# Altium PCB PCB-Thermostat.PcbDoc (part 5 of 5)
Units mm, origin at the board's own origin, x right, y up, seen from the top; angles counter-clockwise.
Board outline 100 x 90 mm, 4 copper layers (Top, PWR, GND, Bottom), stack 1.585 mm thick; 188 components, 167 nets, 703 pads, 398 vias.
Unrouted connection lines stored in the file: 2.
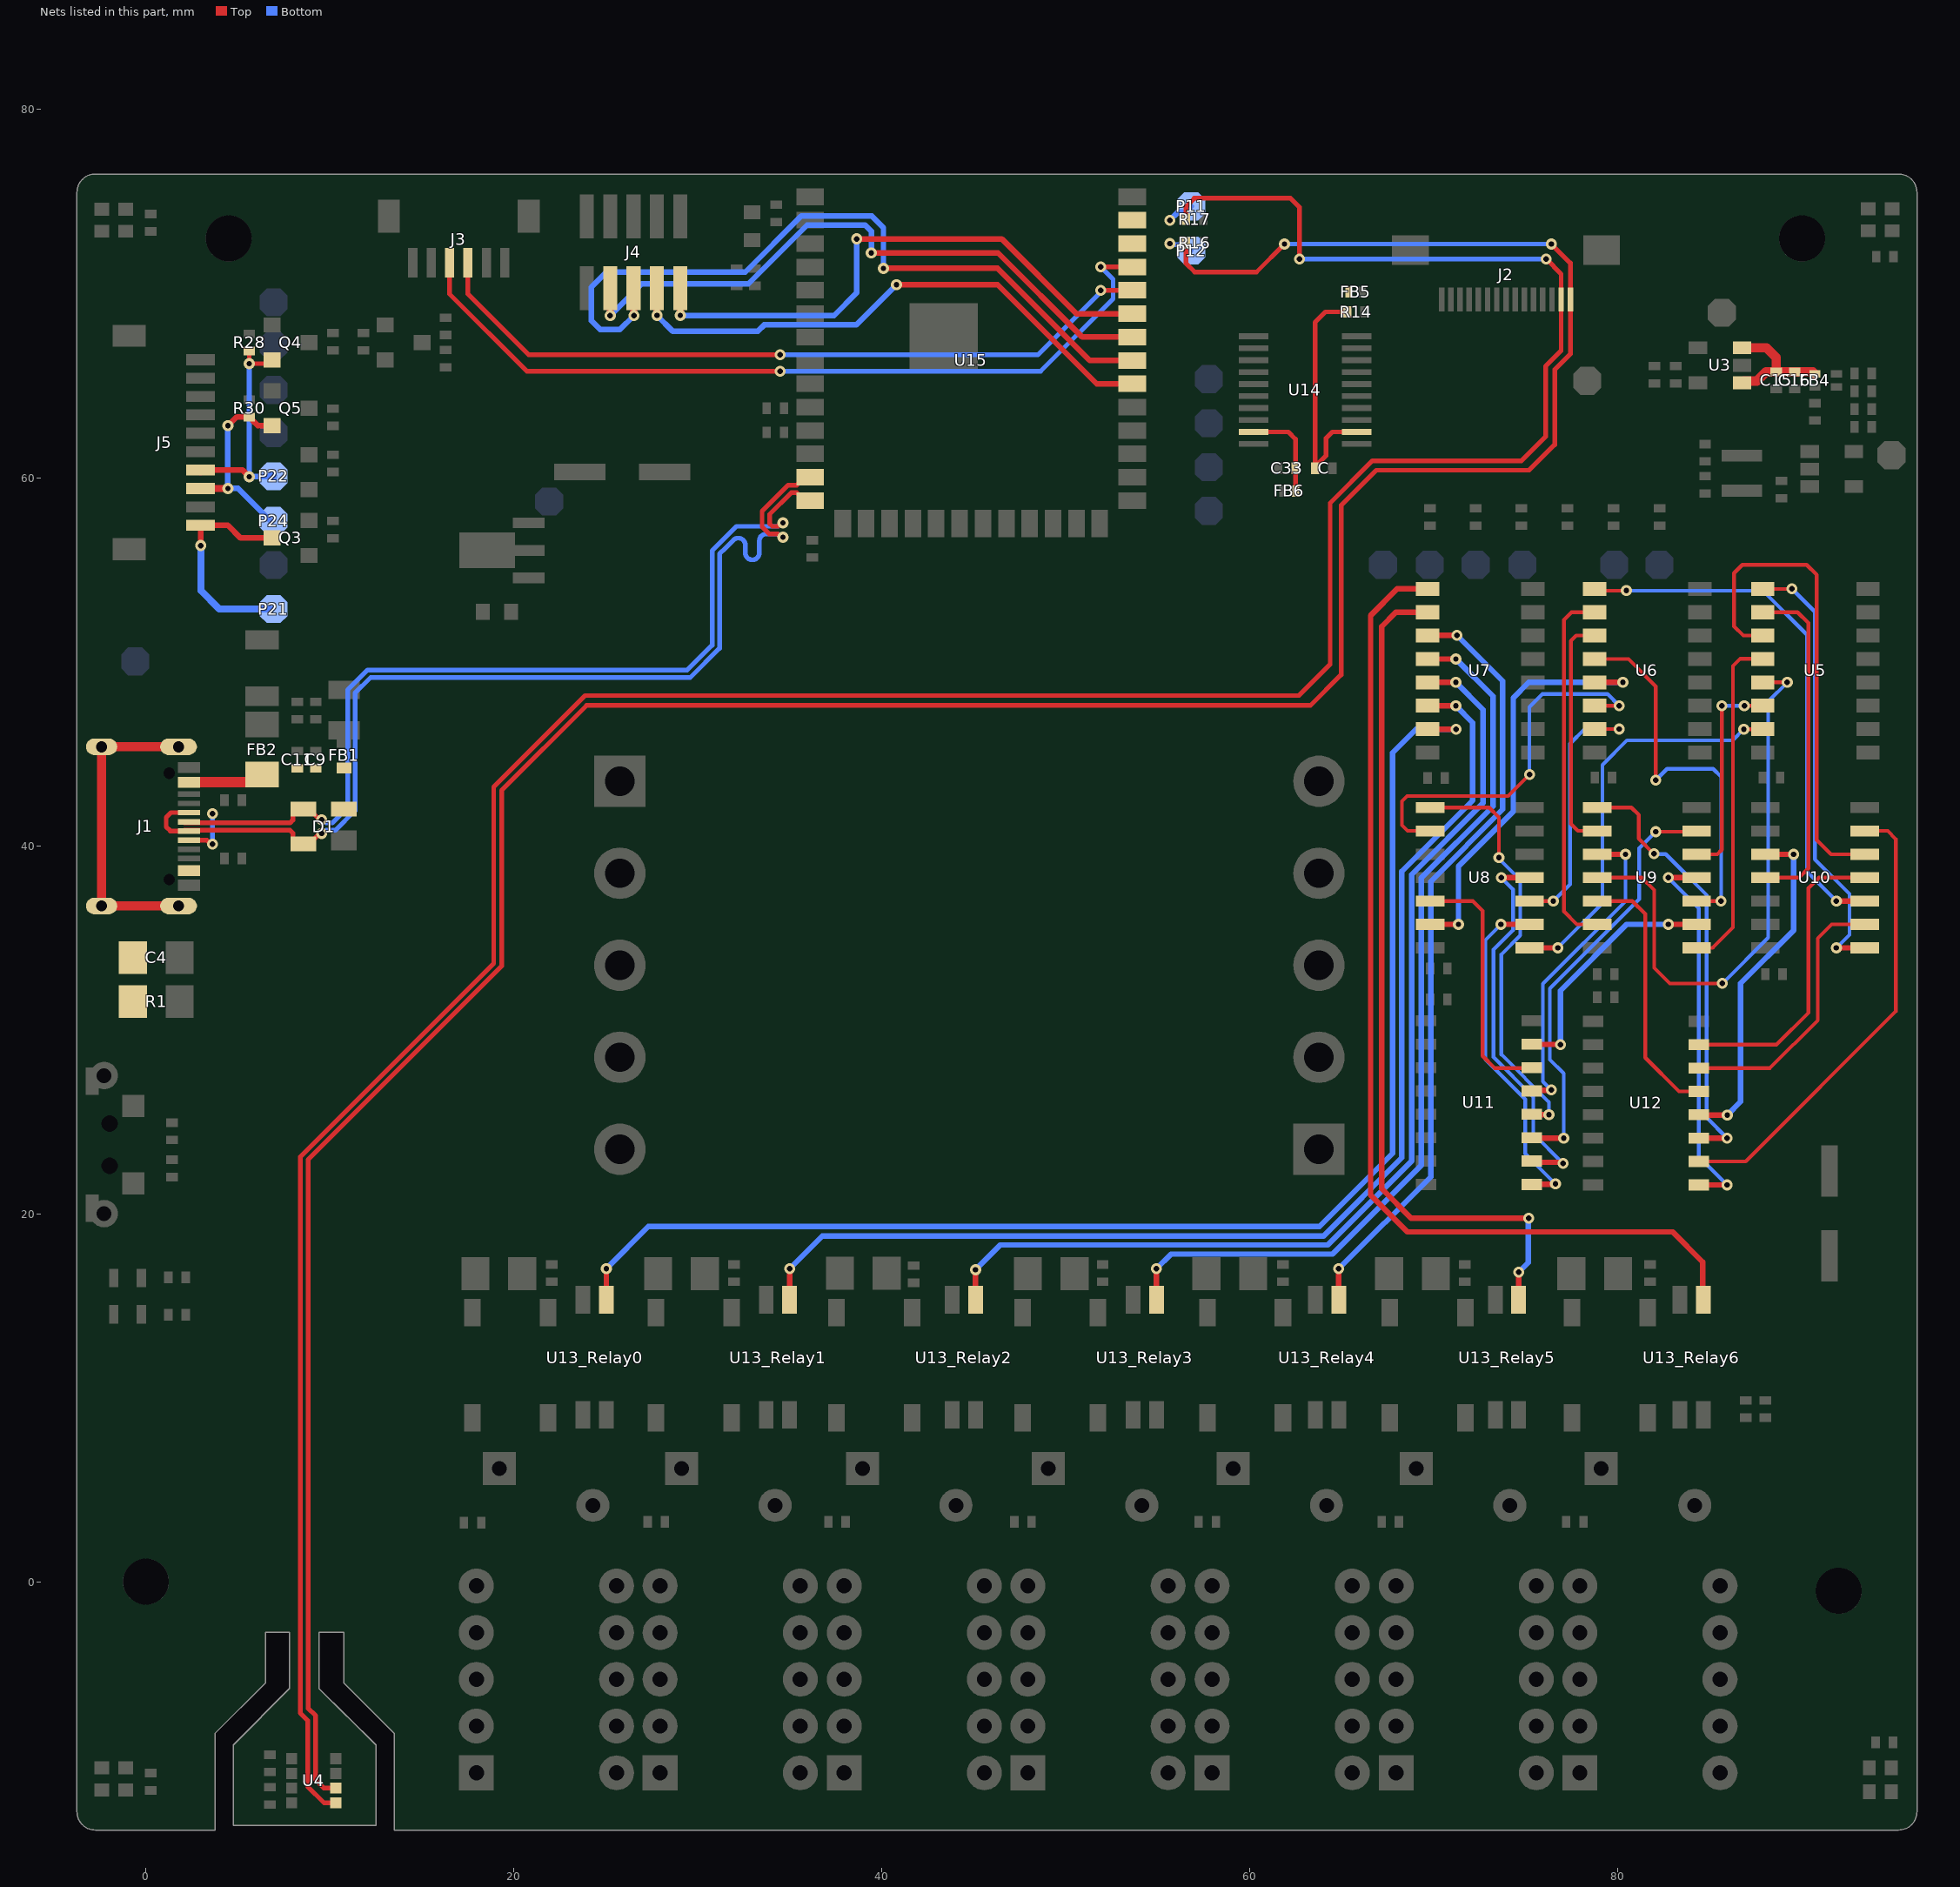
[diagram p5: the nets of this part, all layers, seen from the top]

## Via types
v1: diameter 0.6, hole 0.3, Top to Bottom, 374 vias
v2: diameter 0.8, hole 0.4, Top to Bottom, 22 vias
v3: diameter 0.6, hole 0.3, Top to Bottom, tented top, 2 vias

## Nets (pads, with @x,y where several pads share a name; then routed paths per layer and width w, separated by ;. In a path a pad name is that pad's centre, name@x,y a point inside that pad or via, vN(x,y) a via of type N, cw(c..) or ccw(c..) an arc to the next point about the centre after c; other vN are vias at no path point) (continued)
RELAY_STSN_Relay0: U7.15 U13_Relay0.3 | length 74.3
  Top w0.3: U13_Relay0.3@25.019,15.318 v1(25.019,17.005) ; U7.15@69.654,46.334 U7.15@69.682,46.306 ; U7.15@69.668,46.32 v1(71.203,46.32)
  Bottom w0.3: v1(25.019,17.005) 27.31,19.297 63.772,19.297 67.755,23.28 67.755,45.047 69.028,46.32 v1(71.203,46.32)
RELAY_STSN_Relay1: U7.14 U13_Relay1.3 | length 66.1
  Top w0.3: v1(34.979,17.005) 34.979,15.339 35,15.318 U13_Relay1.3@35,14.772 ; U7.14@69.657,47.602 69.654,47.604 v1(71.189,47.604)
  Bottom w0.3: v1(34.979,17.005) 36.753,18.78 64.001,18.78 68.254,23.033 68.254,38.602 72.108,42.456 72.108,46.686 v1(71.189,47.604)
RELAY_STSN_Relay2: U7.13 U13_Relay2.3 | length 57.6
  Top w0.3: U13_Relay2.3@45.088,15.318 v1(45.088,16.955) ; U7.13@69.695,48.834 69.654,48.874 v1(71.189,48.874)
  Bottom w0.3: v1(45.088,16.955) 46.435,18.302 64.225,18.302 68.783,22.86 68.783,38.425 72.675,42.316 72.675,47.388 v1(71.189,48.874)
RELAY_STSN_Relay3: U7.12 U13_Relay3.3 | length 50.5
  Top w0.3: v1(54.918,17.005) 54.918,15.339 54.939,15.318 U13_Relay3.3@54.939,14.772 ; U7.12@69.654,50.144 v1(71.189,50.144)
  Bottom w0.3: v1(54.918,17.005) 55.718,17.805 64.497,17.805 69.317,22.625 69.317,38.252 73.209,42.144 73.209,48.124 v1(71.189,50.144)
RELAY_STSN_Relay4: U7.11 U13_Relay4.3 | length 42.5
  Top w0.3: U13_Relay4.3@64.824,15.318 v1(64.824,17.005) ; U7.11@69.654,51.414 U7.11@69.719,51.479 ; U7.11@69.719,51.428 v1(71.254,51.428)
  Bottom w0.3: v1(64.824,17.005) 69.825,22.006 69.825,38.053 73.738,41.967 73.738,48.944 v1(71.254,51.428)
RELAY_STSN_Relay5: U7.10 U13_Relay5.3 | length 46.7
  Top w0.3: U7.10@69.654,52.684 67.929,52.684 67.158,51.912 67.158,21.356 68.754,19.759 v1@75.133,19.759 ; U13_Relay5.3@74.603,15.318 v1(74.603,16.818)
  Bottom w0.3: v1(74.603,16.818) 75.133,17.348 v1@75.133,19.757
  other v1: 75.149,19.759
RELAY_STSN_Relay6: U7.9 U13_Relay6.3 | length 56.8
  Top w0.3: U7.9@69.654,53.954 67.999,53.954 66.554,52.509 66.554,21.009 68.554,19.009 82.972,19.009 84.607,17.374 U13_Relay6.3@84.607,15.318
RLY_R0: U8.2 U11.1 | length 18.9
  Top w0.3: v1(73.641,35.719) U8.2@75.194,35.719 ; U11.1@75.319,21.564 75.358,21.602 76.593,21.602 v1(76.606,21.615)
  Bottom w0.2: v1(73.641,35.719) 72.794,34.872 72.794,28.384 74.96,26.219 74.96,23.262 v1(76.606,21.615)
RLY_R1: U9.6 U11.3 | length 22.8
  Top w0.2: v1(82.054,40.759) 83.689,40.759 U9.6@83.729,40.799
  Top w0.3: U11.3@75.319,24.104 v1(77.049,24.104)
  Bottom w0.2: v1(77.049,24.104) 77.049,27.624 76.302,28.372 76.302,32.237 81.155,37.091 81.155,39.86 v1(82.054,40.759)
RLY_R2: U9.10 U11.5 | length 18.7
  Top w0.2: U9.10@78.779,39.529 79.984,39.529
  Top w0.3: U11.5@75.32,26.644 75.371,26.695 76.352,26.695 v1(76.378,26.721) ; U9.10@78.871,39.529 v1(80.406,39.529)
  Bottom w0.2: v1(76.378,26.721) 75.924,27.175 75.924,32.494 80.406,36.977 v1(80.406,39.529)
RLY_R3: U9.2 U11.7 | length 14.3
  Top w0.2: v1@82.814,35.719 U9.2@83.729,35.719
  Top w0.3: U11.7@75.32,29.184 75.332,29.197 76.867,29.197 v1(76.879,29.184) ; v1(82.736,35.719) 82.814,35.719 U9.2@84.271,35.719
  Bottom w0.3: v1(76.879,29.184) 76.879,32.125 80.474,35.719 v1(82.736,35.719)
RLY_R4: U10.6 U12.2 | length 26
  Top w0.2: U12.2@84.396,22.834 86.943,22.834 95.098,30.988 95.098,40.361 94.659,40.799 U10.6@92.729,40.799
RLY_R5: U10.10 U12.4 | length 19
  Top w0.2: U10.10@87.779,39.529 U10.10@88.006,39.529 U10.10@88.624,39.529
  Top w0.3: U12.4@84.396,25.374 84.409,25.362 v1(85.944,25.362) ; U10.10@88.624,39.529 v1(89.541,39.529)
  Bottom w0.3: v1(85.944,25.362) 86.667,26.085 86.667,32.516 89.541,35.391 v1(89.541,39.529)
RLY_R6: U10.2 U12.6 | length 14.2
  Top w0.2: U12.6@84.396,27.914 88.264,27.914 90.854,30.504 90.854,34.959 91.614,35.719 U10.2@92.729,35.719
RLY_S0: U8.4 U11.2 | length 21.1
  Top w0.3: v1(73.659,38.259) U8.4@75.194,38.259 ; U11.2@75.319,22.834 75.363,22.79 76.955,22.79 v1(77.013,22.733)
  Bottom w0.2: v1(73.659,38.259) 74.294,37.624 74.294,35.402 73.237,34.345 73.237,28.507 75.402,26.342 75.402,24.344 v1(77.013,22.733)
RLY_S1: U8.8 U11.4 | length 23
  Top w0.2: U8.8@69.794,42.069 73,42.069 73.533,41.535 v1(73.533,39.345)
  Top w0.3: U11.4@75.32,25.375 75.333,25.387 76.238,25.387 v1(76.251,25.375)
  Bottom w0.2: v1(73.533,39.345) 73.533,39.294 74.693,38.134 74.693,35.119 73.665,34.091 73.665,28.646 76.251,26.06 v1(76.251,25.375)
RLY_S2: U8.12 U11.6 | length 13.4
  Top w0.2: U8.12@69.779,36.989 72.112,36.989 72.645,36.456 72.645,28.568 73.299,27.914 U11.6@74.779,27.914
RLY_S3: U9.4 U12.1 | length 22.6
  Top w0.3: v1(82.736,38.259) U9.4@84.271,38.259 ; U12.1@84.396,21.564 v1(85.931,21.564) U12.1@84.396,21.564
  Bottom w0.2: v1(82.736,38.259) 84.395,36.6 84.395,23.1 v1(85.931,21.564)
RLY_S4: U9.8 U12.3 | length 23.9
  Top w0.2: U9.8@78.871,42.069 80.731,42.069 81.128,41.672 81.128,40.386 v1(81.954,39.559)
  Top w0.3: U12.3@84.396,24.104 v1(85.931,24.104)
  Bottom w0.2: v1(81.954,39.559) 81.975,39.538 82.595,39.538 84.823,37.309 84.823,25.212 v1(85.931,24.104)
RLY_S5: U9.12 U12.5 | length 14.4
  Top w0.2: U9.12@78.871,36.989 80.779,36.989 81.483,36.285 81.483,28.473 83.313,26.644 U12.5@84.396,26.644
RLY_S6: U10.4 U12.7 | length 16.1
  Top w0.2: U12.7@84.396,29.184 88.619,29.184 90.354,30.919 90.354,37.693 90.92,38.259 U10.4@92.729,38.259
RLYRSTN0: U5.15 U8.1 | length 21.8
  Top w0.2: v1@86.741,46.33 v1(86.843,46.33) U5.15@87.609,46.33
  Top w0.3: U8.1@75.194,34.449 v1(76.729,34.449)
  Bottom w0.2: v1(76.729,34.449) 79.151,36.871 79.151,44.385 80.487,45.721 86.234,45.721 v1(86.843,46.33)
RLYRSTN1: U5.14 U9.5 | length 12
  Top w0.2: U9.5@83.729,39.529 U9.5@84.271,39.529 84.724,39.529 85.401,39.529 85.649,39.776 v1(85.649,47.6) ; v1@86.766,47.6 v1(86.868,47.6) U5.14@87.669,47.6
  Bottom w0.2: v1(85.649,47.6) v1(86.868,47.6)
RLYRSTN2: U5.13 U9.11 | length 30.8
  Top w0.2: U9.11@78.871,38.259 81.297,38.259 81.967,37.589 81.967,33.363 82.819,32.512 v1(85.674,32.512) ; U5.13@87.866,48.874 v1(89.199,48.874)
  Bottom w0.2: v1(85.674,32.512) 88.163,35.001 88.163,47.838 v1(89.199,48.874)
RLYRSTN3: U5.12 U9.1 | length 18.9
  Top w0.2: U9.1@83.729,34.449 85.144,34.449 86.254,35.559 86.254,49.759 86.654,50.159 87.739,50.159 U5.12@87.754,50.144
RLYRSTN4: U5.11 U10.5 | length 26.1
  Top w0.2: U5.11@87.754,51.414 86.813,51.414 86.309,51.918 86.309,54.814 86.754,55.259 90.259,55.259 90.798,54.72 90.798,40.308 91.577,39.529 U10.5@92.729,39.529
RLYRSTN5: U5.10 U10.11 | length 19
  Top w0.2: U5.10@87.754,52.684 89.763,52.684 90.348,52.099 90.348,38.76 89.846,38.259 U10.11@88.006,38.259 U10.11@87.779,38.259
RLYRSTN6: U5.9 U10.1 | length 24.4
  Top w0.2: U5.9@87.754,53.954 U5.9@87.866,53.954 89.449,53.954 v1(89.454,53.959) ; 92.406,34.467 92.424,34.449
  Top w0.3: v1(91.871,34.449) 92.424,34.449 U10.1@93.406,34.449
  Bottom w0.2: v1(89.454,53.959) 90.703,52.71 90.703,39.252 92.583,37.372 92.583,35.161 v1(91.871,34.449)
RLYSETN0: U6.15 U8.3 | length 14.6
  Top w0.2: U8.3@75.194,36.989 v1(76.486,36.989) ; U6.15@78.731,46.334 v1(80.064,46.334)
  Bottom w0.2: v1(76.486,36.989) 77.394,37.897 77.394,45.542 78.185,46.334 v1(80.064,46.334)
RLYSETN1: U6.14 U8.9 | length 21
  Top w0.2: U8.9@69.779,40.799 68.567,40.799 68.254,41.112 68.254,42.412 68.544,42.702 74.034,42.702 v1(75.191,43.859) ; U6.14@78.731,47.604 U6.14@78.754,47.604 ; U6.14@78.799,47.559 U6.14@78.754,47.604 ; v1(80.064,47.604) U6.14@78.754,47.604
  Bottom w0.2: v1(75.191,43.859) 75.191,47.53 75.897,48.236 79.432,48.236 v1(80.064,47.604)
RLYSETN2: U6.13 U8.13 | length 22.9
  Top w0.2: U8.13@69.779,35.719 U8.13@69.794,35.719
  Top w0.3: U8.13@69.794,35.719 v1(71.329,35.719) ; U6.13@78.731,48.874 v1(80.266,48.874)
  Bottom w0.3: v1(71.329,35.719) 71.329,38.882 74.309,41.862 74.309,48.034 75.149,48.874 v1(80.266,48.874)
RLYSETN3: U6.12 U9.3 | length 21.6
  Top w0.2: U6.12@78.754,50.144 80.569,50.144 82.054,48.659 v1(82.054,43.559) ; U9.3@83.729,36.989 U9.3@84.271,36.989 v1(85.604,36.989)
  Bottom w0.2: v1(82.054,43.559) 82.666,44.171 85.173,44.171 85.604,43.739 v1(85.604,36.989)
RLYSETN4: U6.11 U9.9 | length 12.9
  Top w0.2: U6.11@78.731,51.414 77.728,51.414 77.441,51.127 77.441,41.177 77.819,40.799 U9.9@78.779,40.799
RLYSETN5: U6.10 U9.13 | length 19.7
  Top w0.2: U6.10@78.754,52.684 77.479,52.684 77.064,52.268 77.064,36.424 77.768,35.719 U9.13@78.779,35.719
RLYSETN6: U6.9 U10.3 | length 29.2
  Top w0.2: U6.9@78.754,53.954 78.849,53.859 v1(80.454,53.859)
  Top w0.3: v1(91.871,36.989) U10.3@93.406,36.989
  Bottom w0.2: v1(80.454,53.859) 87.873,53.859 90.277,51.455 90.277,38.583 v1(91.871,36.989)
RSTKEY: J5.10 P21.1 Q3.3 | length 11.9
  Top w0.305: J5.10@2.961,57.409 4.45,57.409 5.141,56.718 Q3.3@6.865,56.718 ; v1(2.982,56.308) J5.10@2.982,57.388
  Bottom w0.381: v1(2.982,56.308) 2.982,53.863 3.988,52.857 P21.1@6.782,52.857
RX_1V8: J5.7 P22.1 Q4.2 R28.1 | length 12.2
  Top w0.254: R28.1@5.613,66.876 v1(5.613,66.192) 6.661,66.192 Q4.2@6.865,66.396
  Top w0.305: J5.7@2.965,60.405 5.254,60.405 v1(5.613,60.046)
  Top w0.559: J5.7@2.961,60.409 J5.7@2.965,60.405
  Bottom w0.305: v1(5.613,60.046) v1(5.613,66.192) ; v1@5.621,60.053 P22.1@6.84,60.053
  Bottom w0.559: v1(5.613,60.046) v1@5.621,60.053 ; P22.1@6.84,60.053 P22.1@6.858,60.071
RXD: J3.4 U15.36 | length 40.7
  Top w0.254: J3.4@17.5,71.674 17.5,69.98 20.805,66.675 v1(34.468,66.675) ; v1(51.892,70.18) U15.36@53.6,70.18
  Bottom w0.254: v1(34.468,66.675) 48.463,66.675 51.892,70.104 v1(51.892,70.18)
SCL: J2.2 P11.1 R17.1 U4.4 U15.39 | length 166.2
  Top w0.254: U4.4@10.319,-12.02 9.684,-12.02 8.788,-11.125 8.788,-7.544 8.382,-7.138 8.382,23.079 18.898,33.595 18.898,43.189 23.867,48.158 62.662,48.158 64.357,49.853 64.357,58.617 66.658,60.918 74.754,60.918 76.064,62.228 76.064,66.043 76.914,66.893 J2.2@76.914,69.679 76.914,71.066 v1(76.098,71.882) ; R17.1@56.528,74.041 56.528,74.734 56.978,75.184 62.205,75.184 62.687,74.701 v1(62.687,71.882)
  Bottom w0.254: v1(62.687,71.882) v1(76.098,71.882)
  Bottom w0.305: v1(55.651,73.99) 56.084,74.423 56.489,74.423 P11.1@56.807,74.741
SDA: J2.1 P12.1 R16.1 U4.3 U15.38 | length 164.8
  Top w0.254: U4.3@10.319,-11.22 9.671,-11.22 9.22,-10.77 9.22,-7.29 8.812,-6.881 8.812,22.934 19.329,33.452 19.329,43.002 23.952,47.625 63.297,47.625 64.957,49.285 64.957,58.496 66.862,60.401 75.171,60.401 76.564,61.794 76.564,65.867 77.414,66.717 J2.1@77.414,69.679 77.414,71.659 v1(76.378,72.695) ; R16.1@56.528,72.746 56.528,71.641 56.998,71.171 60.35,71.171 v1(61.874,72.695)
  Bottom w0.254: v1@55.626,72.72 55.689,72.657 56.49,72.657 P12.1@56.807,72.339 ; v1(61.874,72.695) v1(76.378,72.695)
  other v1: 55.651,72.72
SH: C4.1 J1.S1 J1.S2 J1.S3 J1.S4 R1.2 | length 17
  Top w0.5: J1.S1@1.77,36.721 J1.S2@-2.41,36.721 J1.S3@-2.41,45.371 J1.S4@1.77,45.371
TCK: J4.4 U15.32 | length 31.3
  Top w0.305: v1(40.792,70.485) 46.289,70.485 51.674,65.1 U15.32@53.6,65.1
  Top w0.381: v1(27.77,68.82) J4.4@27.77,70.688
  Bottom w0.305: v1(27.77,68.82) 27.77,68.811 28.617,67.965 33.261,67.965 33.598,68.302 38.609,68.302 v1(40.792,70.485)
TDI: J4.8 U15.34 | length 35.5
  Top w0.305: v1@39.425,72.212 46.315,72.212 50.887,67.64 U15.34@53.6,67.64
  Top w0.381: v1(25.23,68.811) J4.8@25.23,70.688
  Bottom w0.305: v1(25.23,68.811) 26.955,70.536 32.739,70.536 35.933,73.729 39.088,73.729 39.421,73.397 v1(39.421,72.212)
TDO: J4.6 U15.33 | length 42.1
  Top w0.305: v1(40.081,71.374) 46.286,71.374 51.29,66.37 U15.33@53.6,66.37
  Top w0.381: J4.6@26.506,70.694 26.509,70.691 26.509,68.82 v1(26.518,68.811)
  Bottom w0.305: v1(26.518,68.811) 25.753,68.047 24.689,68.047 24.206,68.529 24.206,70.352 25.025,71.171 32.568,71.171 35.616,74.219 39.445,74.219 40.081,73.583 v1(40.081,71.374)
TMS: J4.2 U15.35 | length 31.5
  Top w0.305: v1(38.633,72.974) 46.506,72.974 50.57,68.91 U15.35@53.6,68.91
  Top w0.381: v1(29.04,68.82) J4.2@29.04,70.673
  Bottom w0.305: v1(29.04,68.82) 29.049,68.811 37.391,68.811 38.633,70.053 v1(38.633,72.974)
TX_1V8: J5.8 P24.1 Q5.2 R30.1 | length 10.8
  Top w0.305: v1(4.451,62.819) 4.921,63.289 R30.1@5.613,63.289 5.702,63.289 5.778,63.213 5.778,63.124 6.083,62.819 Q5.2@6.865,62.819
  Top w0.381: J5.8@2.961,59.409 2.962,59.41 v1(4.451,59.411) v1(4.451,59.411)
  Bottom w0.305: v1(4.451,62.819) v1(4.451,59.411) 5.004,59.411 P24.1@6.756,57.658
TXD: J3.3 U15.37 | length 44.8
  Top w0.254: J3.3@16.5,71.674 16.5,69.984 20.698,65.786 v1(34.468,65.786) ; v1(51.892,71.45) U15.37@53.6,71.45
  Bottom w0.254: v1(34.468,65.786) 48.626,65.786 52.564,69.723 52.564,70.778 v1(51.892,71.45)
USB_N: D1.4 J1.A7 J1.B7 U15.13 | length 56.9
  Top w0.254: J1.A7@2.106,40.796 1.329,40.796 1.098,41.027 1.098,41.533 1.361,41.796 J1.B7@2.34,41.796 ; J1.A7@2.106,40.833 7.838,40.833 7.987,40.684 7.987,40.359 8.26,40.086 8.86,40.086 9.367,40.594 9.481,40.594 v1(9.547,40.66) ; v1(34.62,56.761) 34.526,56.761 34.34,56.947 33.872,56.947 33.485,57.334 33.485,58.171 34.902,59.588 35.368,59.588 35.724,59.944 U15.13@36.119,59.944
  Bottom w0.254: v1(9.547,40.66) 9.641,40.66 9.814,40.833 10.295,40.833 11.366,41.905 11.366,48.291 12.212,49.136 23.526,49.136 27.813,49.136 29.587,49.136 31.175,50.725 31.175,55.856 31.496,56.176 31.925,56.605 cw(c32.195,56.336) 32.576,56.336 32.576,55.914 ccw(c32.957,55.914) 33.338,55.914 33.338,56.566 cw(c33.719,56.566) 33.719,56.947 34.347,56.947 34.36,56.934
USB_P: D1.3 J1.A6 J1.B6 U15.14 | length 53.8
  Top w0.254: J1.A6@2.106,41.239 7.838,41.239 7.987,41.388 7.987,41.713 8.26,41.986 8.86,41.986 9.367,41.479 9.481,41.479 v1(9.547,41.412) ; J1.B6@2.34,40.296 3.306,40.296 3.516,40.086 v1@3.571,40.086 ; v1(34.62,57.539) 34.526,57.539 34.34,57.353 34.04,57.353 33.891,57.502 33.891,58.003 35.071,59.182 35.368,59.182 35.876,58.674 U15.14@36.119,58.674
  Bottom w0.254: v1(3.61,40.086) v1(3.61,41.743) ; v1(9.547,41.412) 9.641,41.412 9.814,41.239 10.126,41.239 10.96,42.073 10.96,48.459 12.044,49.543 29.418,49.543 30.769,50.893 30.769,56.024 32.098,57.353 34.347,57.353 34.36,57.366
VBUS: C9.1 C11.1 D1.2 FB1.1 FB2.1 J1.A4/B9 J1.B4/A9 | length 4.5
  Top w0.254: J1.B4/A9@2.215,38.771 J1.B4/A9@2.34,38.646 ; J1.A4/B9@2.215,43.321 J1.A4/B9@2.34,43.446
  Top w0.559: J1.A4/B9@2.34,43.446 5.904,43.446 FB2.1@6.322,43.863
VCCA: C.2 FB5.2 R14.2 U14.2 | length 13.6
  Top w0.254: C.2@63.536,60.512 C.2@63.536,60.601 ; R14.2@65.286,69.006 64.103,69.006 63.536,68.439 C.2@63.536,60.601 ; U14.2@65.903,62.484 U14.2@65.803,62.484 64.476,62.484 64.135,62.143 64.135,61.2 C.2@63.536,60.601
VCCB: C33.1 FB6.1 U14.19 | length 5.4
  Top w0.254: U14.19@60.103,62.484 62.082,62.484 62.473,62.093 C33.1@62.473,60.512 62.477,60.508 62.477,59.273 FB6.1@62.481,59.269
VIN_3V3C: C15.1 C16.2 FB4.2 U3.1 U3.3 | length 7.1
  Top w0.508: U3.1@86.744,65.153 86.84,65.249 87.551,65.249 88.049,65.748 C15.1@88.595,65.748 ; U3.3@86.744,67.053 88.064,67.053 88.595,66.523 C15.1@88.595,65.748 ; FB4.2@90.703,65.628 90.703,65.636 90.591,65.748 C16.2@89.606,65.748 C15.1@88.595,65.748
pads on no net: J1.A8 J1.B8 J1.MH J4.7 LED6.2 SW1.3 SW1.4 SW1.5 SW1.6 SW1.MH0 SW1.MH1 U1.4 U3.4 U5.7 U6.7 U7.7 U8.5 U8.6 U8.10 U8.11 U10.8 U10.9 U10.12 U10.13 U15.16 U15.26

## Polygon pours and split planes (outlines as drawn)
GND on Top "GND_L01_P003" (solid, remove dead copper, pour order 3): -3.226,-10.24 ccw(c-0.722,-10.761) -1.902,-13.03 3.124,-13.03 3.124,-7.798 5.893,-5.029 5.893,-2.134 7.8,-2.134 9.4,-2.134 11.455,-2.134 11.455,-5.156 14.11,-7.811 14.11,-13.03 91.575,-13.03 ccw(c92.804,-9.767) 95.829,-11.5 95.839,74.646 ccw(c94.313,74.481) 94.313,76.016 -2.531,76.016 ccw(c-2.427,75.208) -3.226,75.366
VBUS on Top "VBUS_L01_P000" (solid, pour order 0): 2.106,43.739 0.896,43.739 -0.254,42.589 -0.254,39.714 1.006,38.454 2.106,38.454
+3V3 on Top "+3V3_L01_P015" (solid, pour order 15): 19.94,57.252 19.94,62.303 25.222,62.303 25.222,57.252
+5V on Top "+5V_L01_P012" (solid, remove dead copper, pour order 12): 9.906,47.959 9.906,51.715 12.979,54.788 12.979,62.459 18.72,62.459 18.72,57.012 23.787,57.012 23.787,55.079 18.72,55.079 18.72,47.959 18.647,47.959
GND on Bottom "GND_L04_P007" (solid, remove dead copper, pour order 7): -3.22,-10.231 ccw(c-0.715,-10.752) -1.896,-13.021 3.13,-13.021 3.13,-7.789 5.899,-5.02 5.899,-2.125 7.806,-2.125 9.406,-2.125 11.462,-2.125 11.462,-5.147 14.116,-7.802 14.116,-13.021 91.581,-13.021 ccw(c92.81,-9.758) 95.836,-11.491 95.845,74.655 ccw(c94.319,74.49) 94.319,76.025 -2.525,76.025 ccw(c-2.421,75.217) -3.22,75.375
+3V3 on Bottom "+3V3_L04_P010" (solid, pour order 10): 19.939,62.433 25.4,62.433 25.4,57.252 19.939,57.252
+5V on Bottom "+5V_L04_P014" (solid, pour order 14): 18.898,59.487 18.898,51.816 12.751,51.816 12.751,59.487
+5V on Bottom "+5V_L04_P013" (solid, remove dead copper, pour order 13): 13.462,60.884 13.462,51.74 19.05,51.74 19.075,51.74 19.075,62.408 13.462,62.408
+3V3 on PWR "+3V3_L02_P008" (solid, remove dead copper, pour order 8): -3.226,-10.24 ccw(c-0.722,-10.761) -1.902,-13.03 3.124,-13.03 3.124,-7.798 5.893,-5.029 5.893,-2.134 7.8,-2.134 9.4,-2.134 11.455,-2.134 11.455,-5.156 14.11,-7.811 14.11,-13.03 91.575,-13.03 ccw(c92.804,-9.767) 95.829,-11.5 95.839,74.646 ccw(c94.313,74.481) 94.313,76.016 -2.531,76.016 ccw(c-2.427,75.208) -3.226,75.366
+5V on PWR "+5V_L02_P011" (solid, pour order 11): 18.898,59.487 18.898,52.781 12.751,52.781 12.751,59.487
GND on GND "GND_L03_P006" (solid, remove dead copper, pour order 6): -3.226,-10.24 ccw(c-0.722,-10.761) -1.902,-13.03 3.124,-13.03 3.124,-7.798 5.893,-5.029 5.893,-2.134 7.8,-2.134 9.4,-2.134 11.455,-2.134 11.455,-5.156 14.11,-7.811 14.11,-13.03 91.575,-13.03 ccw(c92.804,-9.767) 95.829,-11.5 95.839,74.646 ccw(c94.313,74.481) 94.313,76.016 -2.531,76.016 ccw(c-2.427,75.208) -3.226,75.366

## Keep-outs
Top:
  region: 9.4,-5.814 12.5,-8.89 12.5,-13.25 4.75,-13.25 4.75,-8.875 7.8,-5.807 7.8,-2.75 9.4,-2.75
  region: 69.955,20.549 86.955,20.549 86.955,-13.267 16.129,-13.275 16.129,17.912 20.277,22.186 20.277,43.34 23.571,46.634 69.955,46.634
PWR:
  region: 9.4,-5.814 12.5,-8.89 12.5,-13.25 4.75,-13.25 4.75,-8.875 7.8,-5.807 7.8,-2.75 9.4,-2.75
  region: 69.955,20.549 86.955,20.549 86.955,-13.267 16.129,-13.275 16.129,17.912 20.277,22.186 20.277,43.34 23.571,46.634 69.955,46.634
GND:
  region: 9.4,-5.814 12.5,-8.89 12.5,-13.25 4.75,-13.25 4.75,-8.875 7.8,-5.807 7.8,-2.75 9.4,-2.75
  region: 69.955,20.549 86.955,20.549 86.955,-13.267 16.129,-13.275 16.129,17.912 20.277,22.186 20.277,43.34 23.571,46.634 69.955,46.634
Bottom:
  region: 9.4,-5.814 12.5,-8.89 12.5,-13.25 4.75,-13.25 4.75,-8.875 7.8,-5.807 7.8,-2.75 9.4,-2.75
  region: 69.955,20.549 86.955,20.549 86.955,-13.267 16.129,-13.275 16.129,17.912 20.277,22.186 20.277,43.34 23.571,46.634 69.955,46.634

## Other copper
Top:
  rectangle net 5V_Clean: 84.369,57.277 90.957,59.104
  rectangle net USB_P: 3.327,41.123 3.924,42.023
  rectangle net +3V3: 19.94,57.252 25.222,62.303
  rectangle net +5V: 85.471,60.757 87.935,62.332
  rectangle net NetQ1_3: 14.545,66.936 16.599,67.756
  rectangle net NetQ1_3: 15.964,66.707 16.599,67.984
  rectangle net GND: -1.814,55.509 -0.014,68.309
  rectangle net VBUS: 10.06,41.586 11.709,44.628
  rectangle net NetC8_1: 10.36,45.315 11.709,47.295
  rectangle net SH: -3.2,30.632 0.051,34.798
  rectangle net 5V_Clean: 89.921,57.277 90.957,59.865
  rectangle net 5V_Clean: 84.369,57.277 88.265,59.66
  rectangle net +5V: 83.21,61.366 87.935,62.332
  rectangle net VCCA: 64.999,68.631 65.659,70.46
  rectangle net +5V: 94.463,-10.566 95.352,-7.366
  rectangle net GPIO5: 81.824,56.363 82.688,57.633
  rectangle net GPIO4: 79.324,56.363 80.188,57.633
  rectangle net GPIO9: 74.324,56.134 75.188,57.633
  rectangle net GPIO8: 71.824,56.185 72.688,57.633
  rectangle net SH: -3.2,30.632 -1.473,36.966
  rectangle net GND: 2.134,66.109 3.81,67.886
  rectangle net SCL: 52.85,73.54 56.737,74.44
  rectangle net SDA: 52.85,72.27 56.775,73.17
  rectangle net GPIO7: 69.342,56.134 70.206,57.633
  rectangle net +5V: 94.488,70.434 95.356,73.821
  rectangle net VBUS: 5.283,43.053 11.709,44.628
  rectangle net +5V: -1.575,72.212 0.663,73.787
  rectangle net +5V: -1.499,-11.963 0.663,-10.871
  rectangle net GND: 4.953,42.113 6.375,42.875
  rectangle net NetLED1_1: -0.5,13.919 1.506,15.138
  rectangle net NetLED2_1: -0.5,15.9 1.506,17.12
  rectangle net 3V3_C: 92.116,60.452 95.809,62.027
  rectangle net 1V8_SENSOR: 77.784,64.759 84.912,65.507
  rectangle net 5V_TABLET: 0.711,60.935 3.886,62.789
  rectangle net GND: 7.874,47.574 9.576,48.793
  rectangle net NetC10_1: 5.283,46.583 7.391,48.793
  rectangle net NetC10_1: 5.283,45.745 8.56,47.295
  region net NetC8_1: 11.709,47.295 8.823,47.295 8.823,45.745 11.709,45.745
  rectangle net NetR19_1: 34.361,62.096 36.85,63.01
  rectangle net NetR18_1: 34.386,63.366 36.85,64.28
  region net +3V3: 36.869,74.44 33.924,74.44 33.924,73.553 30.099,73.553 30.099,72.111 33.31,72.111 34.808,73.533 36.869,73.533
  region net GND: 93.04,24.336 93.04,20.297 89.977,20.297 89.977,24.336
  region net +3V3: 93.04,19.736 93.04,15.697 89.977,15.697 89.977,19.736
  region net +5V: 58.754,56.159 60.579,56.159 60.579,54.28 58.754,54.28
  region net GND: 5.918,38.125 5.918,37.363 5.918,34.671 3.226,34.671 3.226,38.125
  region net GND: 4.445,48.006 4.369,47.93 4.369,44.755 3.505,44.755 3.505,46.33 2.642,46.33 2.642,48.006
Bottom:
  rectangle net +3V3: 30.074,71.958 31.582,73.762
  rectangle net 5V_Clean: 85.344,57.048 88.036,58.903
  region net ESP_TXD: 8.407,68.097 8.407,66.37 6.198,66.37 6.172,66.396 6.172,68.097
  region net +5V: 58.754,56.159 60.579,56.159 60.579,54.28 58.754,54.28

## Silkscreen, mask and mechanical layers (free items; w line width, h text height)
Top Overlay:
  lines w0.254: 8.23,43.81 8.23,43.282 8.484,43.028 11.659,43.028 11.887,42.799 ; 9.711,45.263 9.957,45.263 9.957,43.672 10.144,43.485 13.995,43.485 ; 88.214,62.865 88.671,62.408 90.246,62.408 91.338,62.408 92.329,63.398
  text "JLCJLCJLCJLC" at 39.878,75.227 h1.52
  text "%" at 33.796,75.174 h0.64
  text "RADAR" at 68.732,74.755 h1.78
  text "%" at -0.226,74.576 h0.64
  text "%" at 93.766,71.528 h0.64 r90
  text "3V3_SENSOR" at 80.004,69.952 h1.52
  text "%" at 94.075,66.167 h0.64 r270
  text "%" at 87.96,66.091 h0.76
  text "%" at 94.075,65.176 h0.64 r270
  text "%" at 91.135,64.389 h0.64 r270
  text "%" at 82.648,63.824 h0.64
  text "1V8_SENSOR" at 72.09,62.645 h1.52
  text "%" at 94.996,62.281 h0.64 r90
  text "%" at 64.846,60.985 h0.64 r270
  text "%" at 61.189,60.026 h0.64 r90
  text "%" at 89.37,58.504 h0.64 r180
  text "3V3_C" at 95.688,55.778 h1.52 r90
  text "TABLET" at -1.88,55.474 h1.78 r90
  text "%" at 7.747,48.128 h0.64
  text "%" at 8.747,48.128 h0.64
  text "%" at 77.529,44.192 h0.64 r270
  text "%" at 86.627,44.19 h0.64 r270
  text "%" at 68.438,44.168 h0.64 r270
  text "%" at 68.58,33.797 h0.64 r270
  text "%" at 77.605,33.49 h0.64 r270
  text "%" at 86.737,33.497 h0.64 r270
  text "%" at 77.596,32.233 h0.64 r270
  text "%" at 68.559,32.124 h0.64 r270
  text "Thermostat-v2.0" at 8.56,30.829 h2.1
  text "%" at 0.943,25.293 h0.64
  text "#" at 17.031,17.818 h1.14
  text "#" at 26.962,17.818 h1.14
  text "#" at 36.881,17.818 h1.14
  text "#" at 47.053,17.818 h1.14
  text "#" at 56.756,17.818 h1.14
  text "#" at 66.688,17.818 h1.14
  text "#" at 76.594,17.818 h1.14
  text "$" at 21.609,17.551 h1.14
  text "$" at 31.515,17.551 h1.14
  text "$" at 51.556,17.551 h1.14
  text "$" at 61.36,17.551 h1.14
  text "$" at 71.241,17.551 h1.14
  text "$" at 81.299,17.551 h1.14
  text "$" at 41.269,17.501 h1.14
  text "*" at 23.571,15.912 h1.14
  text "*" at 33.528,15.912 h1.14
  text "*" at 43.813,15.912 h1.14
  text "*" at 53.467,15.912 h1.14
  text "*" at 63.373,15.912 h1.14
  text "*" at 73.152,15.912 h1.14
  text "*" at 83.185,15.912 h1.14
  text "&" at 75.955,12.446 h1.14
  text "&" at 16.24,12.421 h1.14
  text "&" at 26.222,12.421 h1.14
  text "&" at 36.027,12.421 h1.14
  text "&" at 46.161,12.421 h1.14
  text "&" at 56.143,12.421 h1.14
  text "&" at 66.049,12.395 h1.14
  text "@" at 17.602,3.874 h1.02
  text "@" at 27.534,3.874 h1.02
  text "@" at 47.549,3.874 h1.02
  text "@" at 67.488,3.874 h1.02
  text "@" at 37.465,3.849 h1.02
  text "@" at 57.48,3.849 h1.02
  text "@" at 77.495,3.696 h1.02
  text "%" at 6.248,-9.068 h0.64
  text "%" at 93.689,-9.224 h0.64 r90
  text "%" at -0.213,-10.043 h0.64
  text "%" at 7.214,-12.319 h0.64 r180
Bottom Overlay:
  text "SCL" at 55.884,74.057 h1.52
  text "SDA" at 55.883,71.66 h1.52
  text "1V8" at 5.929,68.859 h1.52
  text "ESP_TXD" at 5.928,66.345 h1.52
  text "CS" at 56.771,64.592 h1.52
  text "ESP_RXD" at 5.979,63.906 h1.52
  text "SCLK" at 56.772,62.272 h1.52
  text "RGB_DATA" at 5.954,61.595 h1.52
  text "MISO" at 56.772,59.885 h1.52
  text "RX_1V8" at 5.954,59.246 h1.52
  text "3V3" at 20.936,58.014 h1.52
  text "MOSI" at 56.796,57.497 h1.52
  text "TX_1V8" at 5.98,56.845 h1.52
  text "RLYADDR0" at 69.068,56.269 h1.52 r270
  text "RLYADDR1" at 71.558,56.282 h1.52 r270
  text "RLYADDR2" at 74.123,56.269 h1.52 r270
  text "RLYSTS" at 66.513,56.233 h1.52 r270
  text "RLYSET" at 79.075,56.235 h1.52 r270
  text "RLYRST" at 81.571,56.235 h1.52 r270
  text "PWRKEY" at 5.978,54.559 h1.52
  text "RSTKEY" at 5.953,52.121 h1.52
  text "5V_TABLET" at 8.52,49.174 h1.52
  text "Note:" at 15.926,12.649 h1.78
  text "$>> R13_Relay0,R13_Relay6" at 16.053,10.819 h1.52
  text "@>> R12_Relay0,R12_Relay6" at 16.053,9.075 h1.52
  text "&>> BR1_Relay0,BR1_Relay6" at 16.053,7.323 h1.52
  text "#>> C31_Relay0,C31_Relay6" at 16.053,5.734 h1.52
  text "*>> U13_Relay0,U13_Relay6" at 16.053,4.135 h1.52
  text "%>> 100nF 0402" at 16.053,2.132 h1.52
Dimension:
  circle w0.013: c0,0 r1.25
  circle w0.013: c17.94,-0.17 r0.4
  circle w0.013: c17.94,-2.71 r0.4
  circle w0.013: c17.94,-5.25 r0.4
  circle w0.013: c17.94,-7.79 r0.4
  circle w0.013: c17.94,-10.33 r0.4
  circle w0.013: c25.56,-0.17 r0.4
  circle w0.013: c25.56,-2.71 r0.4
  circle w0.013: c25.56,-5.25 r0.4
  circle w0.013: c27.94,-0.17 r0.4
  circle w0.013: c27.94,-2.71 r0.4
  circle w0.013: c27.94,-5.25 r0.4
  circle w0.013: c25.56,-7.79 r0.4
  circle w0.013: c25.56,-10.33 r0.4
  circle w0.013: c27.94,-7.79 r0.4
  circle w0.013: c27.94,-10.33 r0.4
  circle w0.013: c35.56,-0.17 r0.4
  circle w0.013: c35.56,-2.71 r0.4
  circle w0.013: c37.94,-0.17 r0.4
  circle w0.013: c37.94,-2.71 r0.4
  circle w0.013: c35.56,-5.25 r0.4
  circle w0.013: c37.94,-5.25 r0.4
  circle w0.013: c35.56,-7.79 r0.4
  circle w0.013: c37.94,-7.79 r0.4
  circle w0.013: c35.56,-10.33 r0.4
  circle w0.013: c37.94,-10.33 r0.4
  circle w0.013: c45.56,-0.17 r0.4
  circle w0.013: c47.94,-0.17 r0.4
  circle w0.013: c45.56,-2.71 r0.4
  circle w0.013: c47.94,-2.71 r0.4
  circle w0.013: c45.56,-5.25 r0.4
  circle w0.013: c47.94,-5.25 r0.4
  circle w0.013: c55.56,-0.17 r0.4
  circle w0.013: c55.56,-2.71 r0.4
  circle w0.013: c55.56,-5.25 r0.4
  circle w0.013: c45.56,-7.79 r0.4
  circle w0.013: c47.94,-7.79 r0.4
  circle w0.013: c45.56,-10.33 r0.4
  circle w0.013: c47.94,-10.33 r0.4
  circle w0.013: c55.56,-7.79 r0.4
  circle w0.013: c55.56,-10.33 r0.4
  circle w0.013: c57.94,-0.17 r0.4
  circle w0.013: c57.94,-2.71 r0.4
  circle w0.013: c57.94,-5.25 r0.4
  circle w0.013: c65.56,-0.17 r0.4
  circle w0.013: c65.56,-2.71 r0.4
  circle w0.013: c67.94,-0.17 r0.4
  circle w0.013: c67.94,-2.71 r0.4
  circle w0.013: c65.56,-5.25 r0.4
  circle w0.013: c67.94,-5.25 r0.4
  circle w0.013: c57.94,-7.79 r0.4
  circle w0.013: c57.94,-10.33 r0.4
  circle w0.013: c65.56,-7.79 r0.4
  circle w0.013: c67.94,-7.79 r0.4
  circle w0.013: c65.56,-10.33 r0.4
  circle w0.013: c67.94,-10.33 r0.4
  circle w0.013: c75.56,-0.17 r0.4
  circle w0.013: c77.94,-0.17 r0.4
  circle w0.013: c75.56,-2.71 r0.4
  circle w0.013: c77.94,-2.71 r0.4
  circle w0.013: c75.56,-5.25 r0.4
  circle w0.013: c77.94,-5.25 r0.4
  circle w0.013: c75.56,-7.79 r0.4
  circle w0.013: c77.94,-7.79 r0.4
  circle w0.013: c75.56,-10.33 r0.4
  circle w0.013: c77.94,-10.33 r0.4
  circle w0.013: c85.56,-0.17 r0.4
  circle w0.013: c85.56,-2.71 r0.4
  circle w0.013: c85.56,-5.25 r0.4
  circle w0.013: c92,-0.5 r1.25
  circle w0.013: c85.56,-7.79 r0.4
  circle w0.013: c85.56,-10.33 r0.4
  lines w0.254: 15.519,-13.564 15.519,38.125 15.519,-13.564
Board Outline:
  lines w0.254: 56.871,76.505 56.883,76.492 ; -3.75,-12.5 ccw(c-2.75,-12.5) -2.75,-13.5 3.75,-13.5 3.75,-8.25 6.5,-5.5 6.5,-2.75 7.8,-2.75 7.8,-5.8 4.75,-8.875 4.75,-13.25 12.5,-13.25 12.5,-8.875 9.4,-5.8 9.4,-2.75 10.75,-2.75 10.75,-5.5 13.5,-8.25 13.5,-13.5 95.25,-13.5 ccw(c95.25,-12.5) 96.25,-12.5 96.25,75.5 ccw(c95.25,75.5) 95.25,76.5 -2.75,76.5 ccw(c-2.75,75.5) -3.75,75.5 -3.75,-12.5
Fabrication:
  drawing of 511 lines, arcs and shapes, not listed
  text "Layer" at 109.487,93.686 h1.52
  text "Name" at 119.898,93.686 h1.52
  text "Material" at 143.514,93.686 h1.52
  text "Thickness" at 165.352,93.686 h1.52
  text "Constant" at 181.858,93.686 h1.52
  text "Board Layer Stack" at 196.332,93.686 h1.52
  text "Top Overlay" at 119.898,90.638 h1.52
  text "Top Solder" at 119.898,87.59 h1.52
  text "Solder Resist" at 143.514,87.59 h1.52
  text "0.39mil" at 165.352,87.59 h1.52
  text "3.3" at 181.858,87.59 h1.52
  text "1" at 109.487,84.542 h1.52
  text "Top" at 119.898,84.542 h1.52
  text "1.38mil" at 165.352,84.542 h1.52
  text "Dielectric 4" at 119.898,81.494 h1.52
  text "PP-006" at 143.514,81.494 h1.52
  text "8.27mil" at 165.352,81.494 h1.52
  text "4.6" at 181.858,81.494 h1.52
  text "2" at 109.487,78.446 h1.52
  text "PWR" at 119.898,78.446 h1.52
  text "CF-004" at 143.514,78.446 h1.52
  text "0.60mil" at 165.352,78.446 h1.52
  text "Dielectric 1" at 119.898,75.398 h1.52
  text "FR-4" at 143.514,75.398 h1.52
  text "41.93mil" at 165.352,75.398 h1.52
  text "4.6" at 181.858,75.398 h1.52
  text "3" at 109.487,72.35 h1.52
  text "GND" at 119.898,72.35 h1.52
  text "CF-004" at 143.514,72.35 h1.52
  text "0.60mil" at 165.352,72.35 h1.52
  text "Dielectric 5" at 119.898,69.302 h1.52
  text "PP-006" at 143.514,69.302 h1.52
  text "8.27mil" at 165.352,69.302 h1.52
  text "4.6" at 181.858,69.302 h1.52
  text "4" at 109.487,66.254 h1.52
  text "Bottom" at 119.898,66.254 h1.52
  text "1.38mil" at 165.352,66.254 h1.52
  text "Bottom Solder" at 119.898,63.206 h1.52
  text "Solder Resist" at 143.514,63.206 h1.52
  text "0.39mil" at 165.352,63.206 h1.52
  text "3.3" at 181.858,63.206 h1.52
  text "Bottom Overlay" at 119.898,60.158 h1.52
  text "4-Layer Stackup 1.6mm FR4" at 26.289,-17.048 h3.81
Mechanical 13:
  drawing of 8987 lines, arcs and shapes, not listed
Drill Drawing:
  circle w0.254: c-1.813,117.431 r0.508
  circle w0.254: c-1.813,117.431 r0.847
  lines w0.254: -2.66,109.811 -1.813,108.965 -0.966,109.811 -1.813,110.658 -2.66,109.811 ; -2.66,112.775 -0.966,112.775 -0.966,114.468 -2.66,114.468 -2.66,112.775 ; -2.66,120.395 -2.66,120.818 -2.236,121.241 -2.66,121.665 -2.66,122.088 -2.236,122.088 -1.813,121.665 -1.39,122.088 -0.966,122.088 -0.966,121.665 -1.39,121.241 -0.966,120.818 -0.966,120.395 -1.39,120.395 -1.813,120.818 -2.236,120.395 -2.66,120.395 ; -2.66,124.205 -0.966,124.205 -0.966,125.898 -2.66,125.898 -2.66,124.205 ; -2.66,129.708 -0.966,129.708 -1.813,128.015 -2.66,129.708 ; -2.66,132.248 -2.236,132.248 -2.236,131.825 -1.39,131.825 -1.39,132.248 -0.966,132.248 -0.966,133.095 -1.39,133.095 -1.39,133.518 -2.236,133.518 -2.236,133.095 -2.66,133.095 -2.66,132.248 ; -2.66,137.328 -0.966,137.328 -1.813,135.635 -2.66,137.328 ; -2.66,139.868 -2.236,139.868 -1.813,139.445 -1.39,139.868 -0.966,139.868 -1.39,140.291 -0.966,140.715 -1.39,140.715 -1.813,141.138 -2.236,140.715 -2.66,140.715 -2.236,140.291 -2.66,139.868 ; -2.66,143.255 -1.813,143.678 -0.966,143.255 -1.39,144.101 -0.966,144.948 -1.813,144.525 -2.66,144.948 -2.236,144.101 -2.66,143.255 ; -2.321,124.543 -1.305,124.543 -1.305,125.559 -2.321,125.559 -2.321,124.543 ; -2.321,129.369 -1.305,129.369 -1.813,128.353 -2.321,129.369
  lines w0.381: -4.178,107.822 330.297,107.822 ; -4.178,145.922 330.297,145.922 ; 9.814,104.012 9.814,149.732 ; 25.05,104.012 25.05,149.732 ; 52.982,104.012 52.982,149.732 ; 65.831,104.012 65.831,149.732 ; 84.47,104.012 84.47,149.732 ; 114.687,104.012 114.687,149.732 ; 129.669,104.012 129.669,149.732 ; 148.612,104.012 148.612,149.732 ; 177.56,104.012 177.56,149.732 ; 199.245,104.012 199.245,149.732 ; 233.119,104.012 233.119,149.732 ; 266.993,104.012 266.993,149.732 ; 294.671,104.012 294.671,149.732 ; -4.178,104.012 330.297,104.012 330.297,149.732 -4.178,149.732 -4.178,104.012
  text "Symbol" at -1.892,147.065 h1.83
  text "Count" at 10.957,147.065 h1.83
  text "Hole Size" at 26.193,147.065 h1.83
  text "Plated" at 54.125,147.065 h1.83
  text "Hole Type" at 66.974,147.065 h1.83
  text "Drill Layer Pair" at 85.613,147.065 h1.83
  text "Via/Pad" at 115.83,147.065 h1.83
  text "Pad Shape" at 130.812,147.065 h1.83
  text "Template" at 149.755,147.065 h1.83
  text "Description" at 178.703,147.065 h1.83
  text "Hole Tolerance (+)" at 200.388,147.065 h1.83
  text "Hole Tolerance (-)" at 234.262,147.065 h1.83
  text "Hole Length" at 268.136,147.065 h1.83
  text "Routed Path Length" at 295.814,147.065 h1.83
  text "2" at 10.957,143.255 h1.52
  text "0.600mm (23.62mil)" at 26.193,143.255 h1.52
  text "PTH" at 54.125,143.255 h1.52
  text "Slot" at 66.974,143.255 h1.52
  text "Top - Bottom" at 85.613,143.255 h1.52
  text "Pad" at 115.83,143.255 h1.52
  text "Rounded" at 130.812,143.255 h1.52
  text "r90_170h60_140r100" at 149.755,143.255 h1.52
  text "1.400mm (55.12mil)" at 268.136,143.255 h1.52
  text "0.800mm (31.50mil)" at 295.814,143.255 h1.52
  text "2" at 10.957,139.445 h1.52
  text "0.600mm (23.62mil)" at 26.193,139.445 h1.52
  text "PTH" at 54.125,139.445 h1.52
  text "Slot" at 66.974,139.445 h1.52
  text "Top - Bottom" at 85.613,139.445 h1.52
  text "Pad" at 115.83,139.445 h1.52
  text "Rounded" at 130.812,139.445 h1.52
  text "(Mixed)" at 149.755,139.445 h1.52
  text "1.700mm (66.93mil)" at 268.136,139.445 h1.52
  text "1.100mm (43.31mil)" at 295.814,139.445 h1.52
  text "2" at 10.957,135.635 h1.52
  text "0.620mm (24.41mil)" at 26.193,135.635 h1.52
  text "NPTH" at 54.125,135.635 h1.52
  text "Round" at 66.974,135.635 h1.52
  text "Top - Bottom" at 85.613,135.635 h1.52
  text "Pad" at 115.83,135.635 h1.52
  text "Rounded" at 130.812,135.635 h1.52
  text "c0hn62" at 149.755,135.635 h1.52
  text "-" at 268.136,135.635 h1.52
  text "-" at 295.814,135.635 h1.52
  text "2" at 10.957,131.825 h1.52
  text "0.900mm (35.43mil)" at 26.193,131.825 h1.52
  text "NPTH" at 54.125,131.825 h1.52
  text "Round" at 66.974,131.825 h1.52
  text "Top - Bottom" at 85.613,131.825 h1.52
  text "Pad" at 115.83,131.825 h1.52
  text "Rounded" at 130.812,131.825 h1.52
  text "c0hn90" at 149.755,131.825 h1.52
  text "-" at 268.136,131.825 h1.52
  text "-" at 295.814,131.825 h1.52
  text "4" at 10.957,128.015 h1.52
  text "2.500mm (98.43mil)" at 26.193,128.015 h1.52
  text "NPTH" at 54.125,128.015 h1.52
  text "Round" at 66.974,128.015 h1.52
  text "Top - Bottom" at 85.613,128.015 h1.52
  text "Pad" at 115.83,128.015 h1.52
  text "Rounded" at 130.812,128.015 h1.52
  text "c250hn250" at 149.755,128.015 h1.52
  text "-" at 268.136,128.015 h1.52
  text "-" at 295.814,128.015 h1.52
  text "10" at 10.957,124.205 h1.52
  text "1.600mm (62.99mil)" at 26.193,124.205 h1.52
  text "PTH" at 54.125,124.205 h1.52
  text "Round" at 66.974,124.205 h1.52
  text "Top - Bottom" at 85.613,124.205 h1.52
  text "Pad" at 115.83,124.205 h1.52
  text "(Mixed)" at 130.812,124.205 h1.52
  text "(Mixed)" at 149.755,124.205 h1.52
  text "-" at 268.136,124.205 h1.52
  text "-" at 295.814,124.205 h1.52
  text "16" at 10.957,120.395 h1.52
  text "0.800mm (31.50mil)" at 26.193,120.395 h1.52
  text "PTH" at 54.125,120.395 h1.52
  text "Round" at 66.974,120.395 h1.52
  text "Top - Bottom" at 85.613,120.395 h1.52
  text "Pad" at 115.83,120.395 h1.52
  text "(Mixed)" at 130.812,120.395 h1.52
  text "(Mixed)" at 149.755,120.395 h1.52
  text "-" at 268.136,120.395 h1.52
  text "-" at 295.814,120.395 h1.52
  text "22" at 10.957,116.585 h1.52
  text "0.400mm (15.75mil)" at 26.193,116.585 h1.52
  text "PTH" at 54.125,116.585 h1.52
  text "Round" at 66.974,116.585 h1.52
  text "Top - Bottom" at 85.613,116.585 h1.52
  text "Via" at 115.83,116.585 h1.52
  text "Rounded" at 130.812,116.585 h1.52
  text "v80h40" at 149.755,116.585 h1.52
  text "-" at 268.136,116.585 h1.52
  text "-" at 295.814,116.585 h1.52
  text "70" at 10.957,112.775 h1.52
  text "0.820mm (32.28mil)" at 26.193,112.775 h1.52
  text "PTH" at 54.125,112.775 h1.52
  text "Round" at 66.974,112.775 h1.52
  text "Top - Bottom" at 85.613,112.775 h1.52
  text "Pad" at 115.83,112.775 h1.52
  text "(Mixed)" at 130.812,112.775 h1.52
  text "(Mixed)" at 149.755,112.775 h1.52
  text "-" at 268.136,112.775 h1.52
  text "-" at 295.814,112.775 h1.52
  text "376" at 10.957,108.965 h1.52
  text "0.300mm (11.81mil)" at 26.193,108.965 h1.52
  text "PTH" at 54.125,108.965 h1.52
  text "Round" at 66.974,108.965 h1.52
  text "Top - Bottom" at 85.613,108.965 h1.52
  text "Via" at 115.83,108.965 h1.52
  text "Rounded" at 130.812,108.965 h1.52
  text "(Mixed)" at 149.755,108.965 h1.52
  text "-" at 268.136,108.965 h1.52
  text "-" at 295.814,108.965 h1.52
  text "506 Total" at 10.957,105.155 h1.52
  text "Slot definitions :" at -1.892,101.472 h1.52
  text "Routed Path Length" at 24.338,101.472 h1.52
  text "= Calculated from tool start centre position to tool end centre position." at 52.346,101.472 h1.52
  text "Hole Length" at 24.338,98.933 h1.52
  text "= Routed Path Length + Tool Size = Slot length as defined in the PCB layout" at 41.935,98.933 h1.52

## Dimensions
92,-0.5 to 106.197,4.75 on Dimension
4.5,73 to 0,0 on Dimension
4.5,73 to 90,73 on Dimension
96.25,75.5 to -3.75,75.5 on Dimension
-2.75,76.5 to -2.75,-13.5 on Dimension

## Text inside footprints (layer, text, board x,y; h text height)
J1: Top Overlay "Board Edge" at -2.286,44.729 h0.76 r270
J2: Top Overlay "1" at 77.552,71.451 h0.76 r180; Top Overlay "Board Edge" at 77.769,74.223 h0.76 r180